# Altium PCB 后改2025底板线路板图.PcbDoc (part 4 of 4)
Units mm, origin at the board's own origin, x right, y up, seen from the top; angles counter-clockwise.
Board outline 200 x 230 mm, 4 copper layers (Top Layer, GND, POWER, Bottom Layer), stack 0.603 mm thick; 355 components, 331 nets, 1313 pads, 565 vias.
Unrouted connection lines stored in the file: 251.
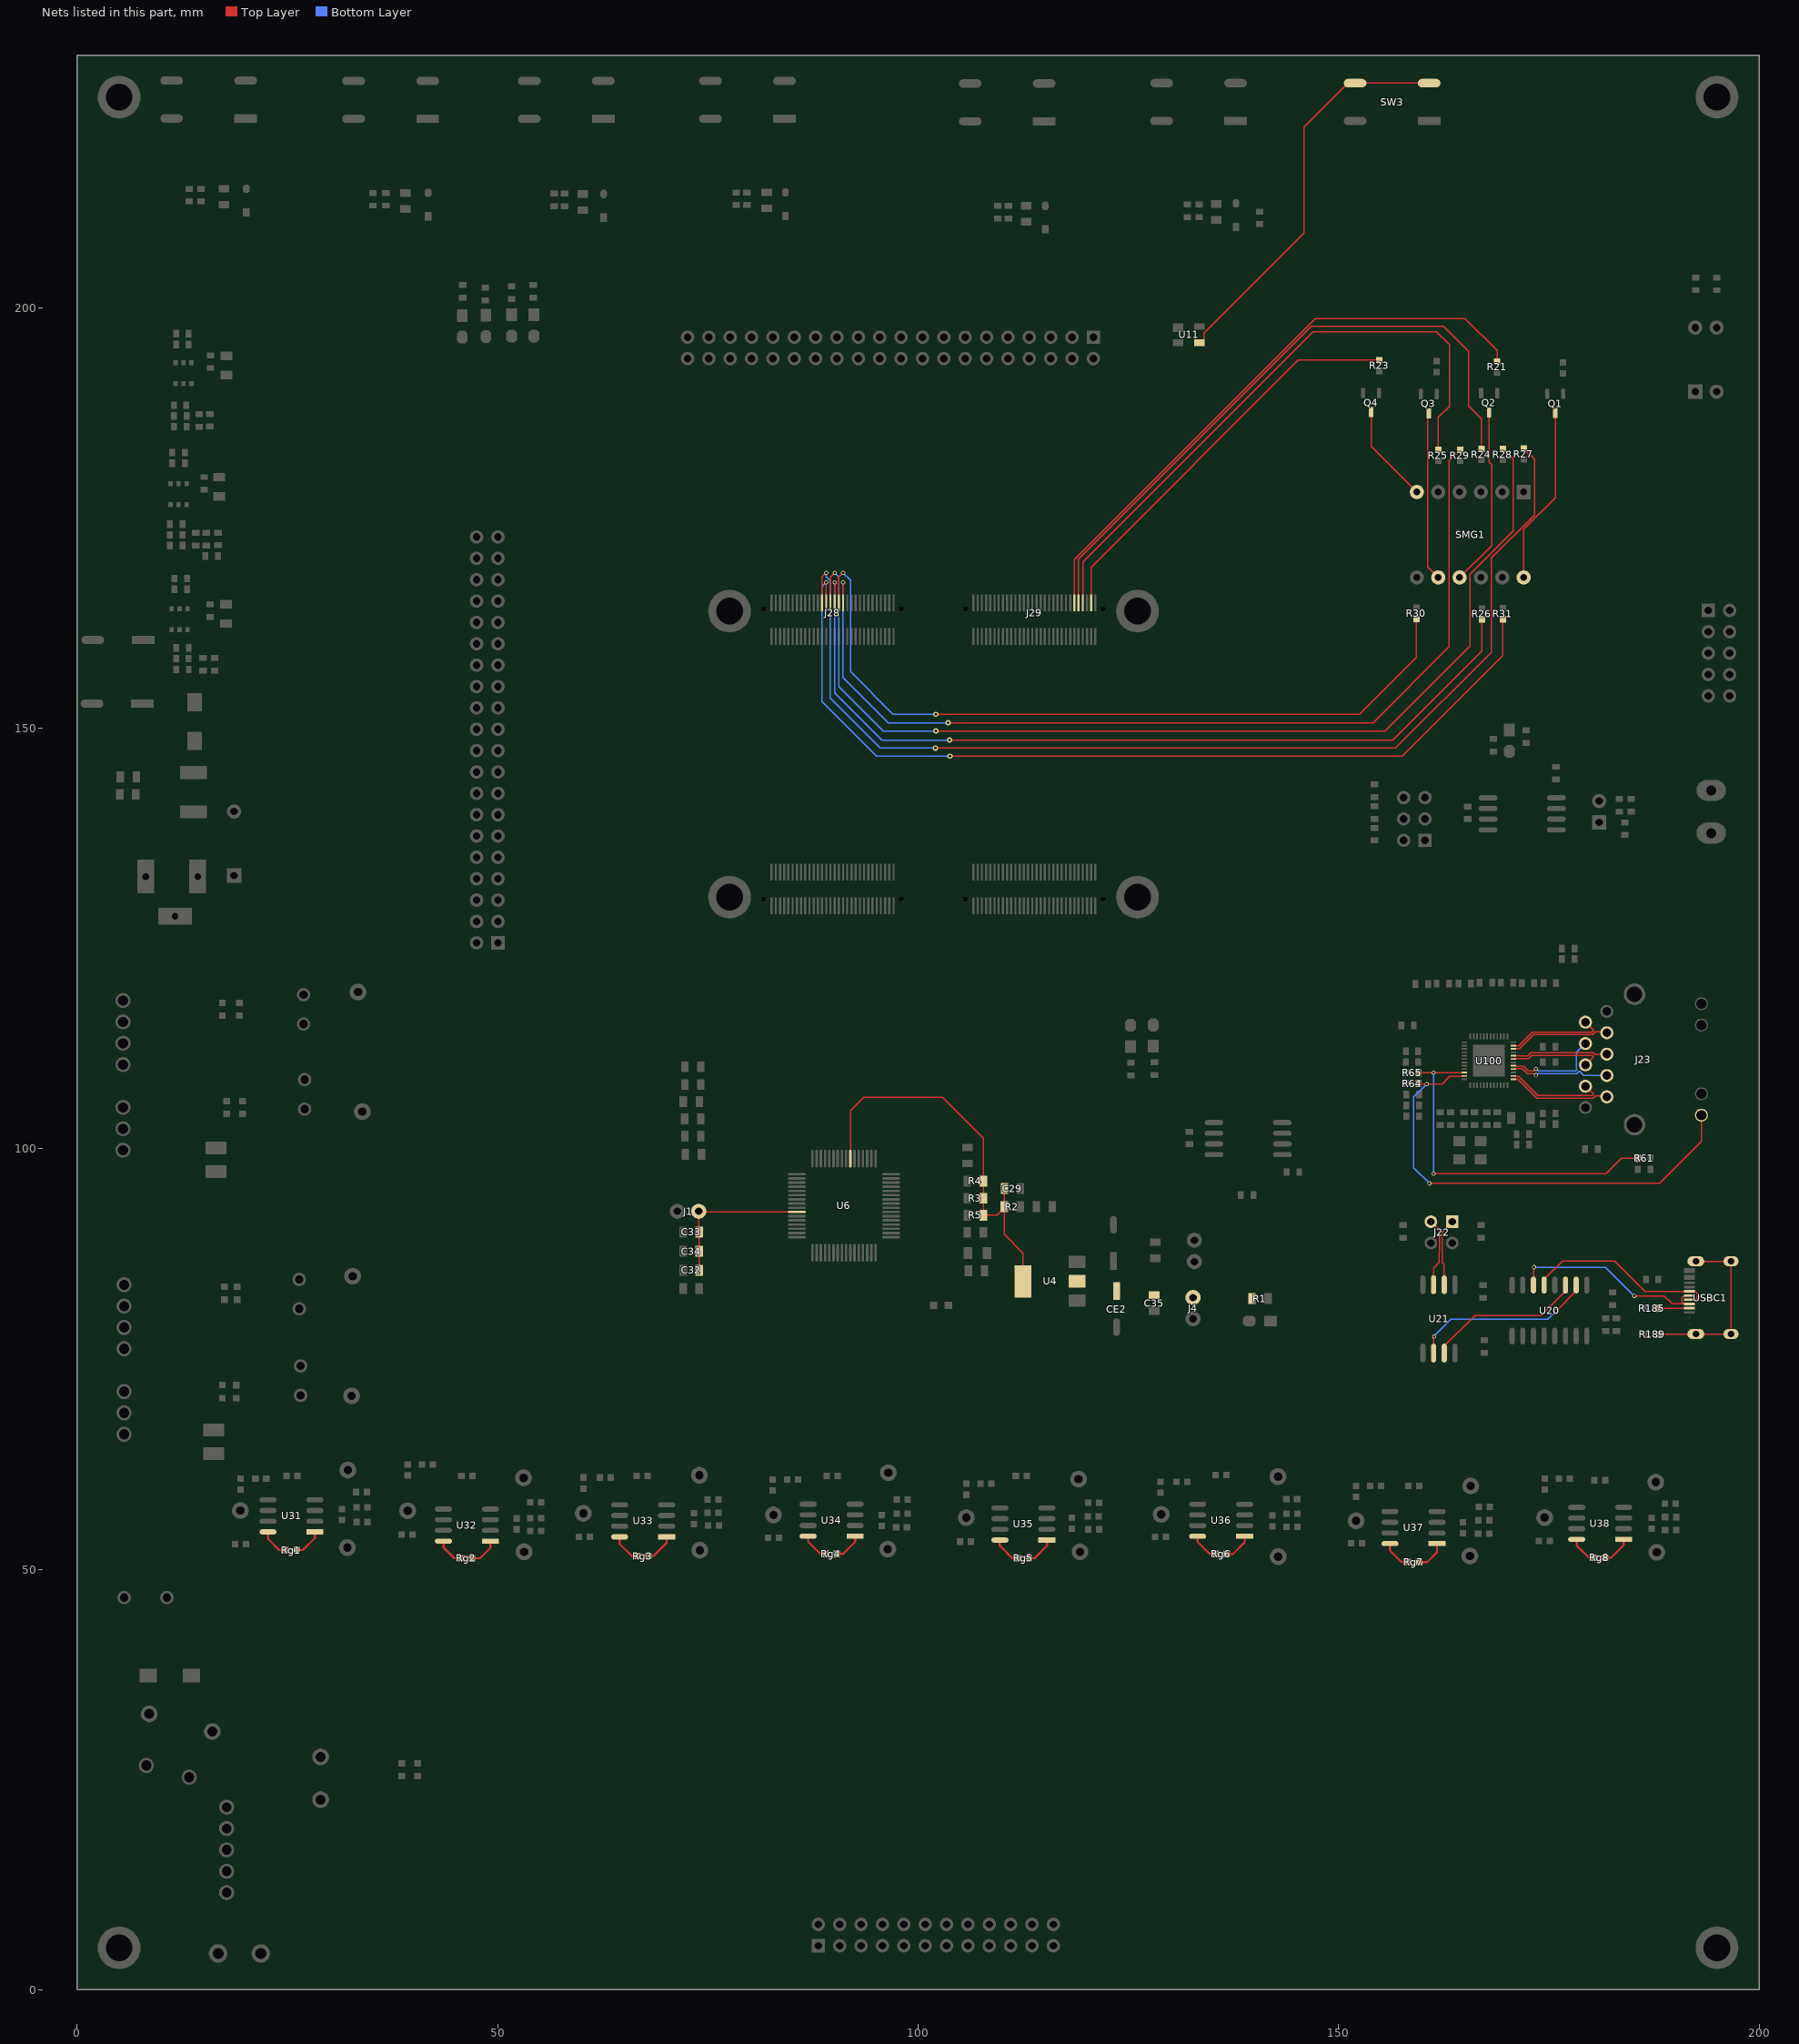
[diagram p6: the nets of this part, all layers, seen from the top]

## Via types
v1: diameter 0.508, hole 0.305, Top Layer to Bottom Layer, tented both sides, 558 vias
v2: diameter 0.635, hole 0.305, Top Layer to Bottom Layer, tented both sides, 7 vias

## Nets (pads, with @x,y where several pads share a name; then routed paths per layer and width w, separated by ;. In a path a pad name is that pad's centre, name@x,y a point inside that pad or via, vN(x,y) a via of type N, cw(c..) or ccw(c..) an arc to the next point about the centre after c; other vN are vias at no path point) (continued)
NetR185_1: R185.1 USBC1.A5 | length 3.6
  Top Layer w0.152: R185.1@188.087,81.026 188.095,81.034 USBC1.A5@191.707,81.034
NetR189_2: R189.2 USBC1.1 USBC1.2 USBC1.3 USBC1.4 | length 21.3
  Top Layer w0.152: R189.2@188.023,77.915 188.068,77.959 USBC1.4@192.475,77.959 ; USBC1.1@192.475,86.609 USBC1.2@196.537,86.609 ; USBC1.4@192.488,77.959 USBC1.3@196.655,77.959 ; USBC1.2@196.655,86.609 196.655,77.983 USBC1.3@196.659,77.978
NetRg1_1: Rg1.1 U31.1 | length 3.5
  Top Layer w0.254: Rg1.1@26.111,52.273 26.857,52.273 28.287,53.704 U31.1@28.287,54.434
NetRg1_2: Rg1.2 U31.8 | length 3.5
  Top Layer w0.254: U31.8@22.699,54.434 22.699,53.602 24.028,52.273 Rg1.2@24.811,52.273
NetRg2_1: Rg2.1 U32.1 | length 3.5
  Top Layer w0.254: Rg2.1@46.939,51.308 47.904,51.308 49.149,52.553 U32.1@49.149,53.34
NetRg2_2: Rg2.2 U32.8 | length 3.4
  Top Layer w0.254: U32.8@43.561,53.34 43.561,52.603 44.856,51.308 Rg2.2@45.639,51.308
NetRg3_1: Rg3.1 U33.1 | length 3.5
  Top Layer w0.254: Rg3.1@67.92,51.562 67.923,51.566 68.533,51.566 70.104,53.137 U33.1@70.104,53.848
NetRg3_2: Rg3.2 U33.8 | length 3.5
  Top Layer w0.254: U33.8@64.516,53.848 64.516,53.016 65.97,51.562 Rg3.2@66.62,51.562
NetRg4_1: Rg4.1 U34.1 | length 3.5
  Top Layer w0.254: Rg4.1@90.322,51.816 91.084,51.816 92.51,53.242 U34.1@92.51,53.926
NetRg4_2: Rg4.2 U34.8 | length 3.3
  Top Layer w0.254: U34.8@86.922,53.926 86.922,53.286 88.392,51.816 Rg4.2@89.022,51.816
NetRg5_1: Rg5.1 U35.1 | length 3.4
  Top Layer w0.254: Rg5.1@113.172,51.308 113.843,51.308 115.316,52.781 U35.1@115.316,53.467
NetRg5_2: Rg5.2 U35.8 | length 3.4
  Top Layer w0.254: U35.8@109.728,53.467 109.728,52.781 111.201,51.308 Rg5.2@111.872,51.308
NetRg6_1: Rg6.1 U36.1 | length 3.4
  Top Layer w0.254: Rg6.1@136.692,51.816 137.444,51.816 138.826,53.198 U36.1@138.826,53.916
NetRg6_2: Rg6.2 U36.8 | length 3.4
  Top Layer w0.254: U36.8@133.238,53.916 133.238,53.249 134.671,51.816 Rg6.2@135.392,51.816
NetRg7_1: Rg7.1 U37.1 | length 3.6
  Top Layer w0.254: Rg7.1@159.563,50.851 160.528,50.851 161.695,52.018 U37.1@161.695,53.042
NetRg7_2: Rg7.2 U37.8 | length 3.5
  Top Layer w0.254: U37.8@156.107,53.042 156.107,52.224 157.48,50.851 Rg7.2@158.263,50.851
NetRg8_1: Rg8.1 U38.1 | length 3.5
  Top Layer w0.254: Rg8.1@181.701,51.359 182.372,51.359 183.896,52.883 U38.1@183.896,53.545
NetRg8_2: Rg8.2 U38.8 | length 3.4
  Top Layer w0.254: U38.8@178.308,53.545 178.308,52.832 179.781,51.359 Rg8.2@180.401,51.359
NetSW3_2: SW3.2 SW3.3 U11.3 | length 48
  Top Layer w0.152: U11.3@133.452,195.809 133.706,195.809 134.01,196.113 134.01,196.933 145.898,208.82 145.898,221.459 151.112,226.674 SW3.3@151.962,226.674 SW3.2@160.762,226.674
NetU20_5: U20.5 USBC1.A6 USBC1.B6 | length 22.9
  Top Layer w0.152: U20.5@174.498,83.82 174.498,84.519 176.644,86.665 182.829,86.665 186.46,83.034 USBC1.B6@191.707,83.034 191.767,82.973 192.464,82.973 192.649,82.789 192.649,82.26 192.474,82.085 191.758,82.085 USBC1.A6@191.707,82.034
NetU20_6: U20.6 USBC1.A7 USBC1.B7 | length 24.9
  Top Layer w0.152: U20.6@173.165,83.782 173.196,83.814 173.196,85.871 v1(173.228,85.903) ; v1(185.166,82.486) 188.722,82.486 189.674,81.534 USBC1.B7@191.707,81.534 191.633,81.608 191.01,81.608 190.817,81.8 190.817,82.268 191.009,82.46 191.633,82.46 USBC1.A7@191.707,82.534
  Bottom Layer w0.152: v1(173.228,85.903) 181.75,85.903 v1(185.166,82.486)
OPT1: Q1.3 SMG1.12 | length 21.1
  Top Layer w0.152: SMG1.12@172.009,167.894 172.009,173.634 175.76,177.386 Q1.3@175.76,187.442
OPT2: Q2.3 SMG1.9 | length 21.3
  Top Layer w0.152: SMG1.9@164.389,167.894 168.199,171.704 168.199,181.305 167.894,181.61 Q2.3@167.894,187.518
OPT3: Q3.3 SMG1.8 | length 20.1
  Top Layer w0.152: Q3.3@160.723,187.411 160.579,187.266 160.579,169.164 SMG1.8@161.849,167.894
OPT4: Q4.3 SMG1.6 | length 11.7
  Top Layer w0.152: Q4.3@153.865,187.543 153.865,183.498 SMG1.6@159.309,178.054
P18: J29.11 R21.1 | length 70.1
  Top Layer w0.152: J29.11@118.578,164.889 118.578,170.012 147.245,198.679 165.049,198.679 168.859,194.869 R21.1@168.859,193.588
P20: J29.3 R23.1 | length 48.7
  Top Layer w0.152: J29.3@120.569,164.897 120.569,169.113 145.197,193.741 R23.1@154.838,193.741
PS_ETH_LED0: R61.1 R65.1 U100.34 | length 42.5
  Top Layer w0.152: R65.1@159.483,109.023 159.489,109.017 v1(161.287,109.017) 164.612,109.017 164.622,109.027 164.934,109.027 U100.34@164.957,109.051 ; v1(161.29,97.028) 181.813,97.028 183.642,98.857 R61.1@185.588,98.857
  Bottom Layer w0.152: v1(161.287,109.017) 161.287,104.074 161.297,104.064 161.297,97.035 v1(161.29,97.028)
PS_ETH_LED1: J23.11 R64.1 U100.35 | length 56.7
  Top Layer w0.152: R64.1@159.483,107.753 159.556,107.68 v1(160.471,107.68) 162.312,107.68 163.213,108.58 164.654,108.58 164.725,108.651 U100.35@164.957,108.651 ; v1(160.791,95.86) 188.163,95.86 193.138,100.834 J23.11@193.138,103.974
  Bottom Layer w0.152: v1(160.471,107.68) 158.933,106.142 158.933,97.718 v1(160.791,95.86)
PS_N0: J23.3 U100.2 | length 11.9
  Top Layer w0.152: U100.2@170.772,108.651 170.796,108.627 171.076,108.627 171.1,108.604 171.394,108.604 173.702,106.296 180.166,106.296 180.255,106.386 180.255,106.512 J23.3@179.348,107.419
PS_N1: J23.7 U100.5 | length 11.6
  Top Layer w0.152: U100.5@170.772,109.851 170.796,109.827 171.076,109.827 171.1,109.804 171.99,109.804 172.546,109.248 173.189,109.248 173.392,109.451 v1(173.456,109.451)
  Bottom Layer w0.152: v1(173.456,109.451) 173.52,109.451 173.723,109.248 178.176,109.248 178.309,109.381 178.309,109.507 178.294,109.523 178.294,111.445 J23.7@179.348,112.499
PS_N2: J23.6 U100.8 | length 11.4
  Top Layer w0.152: U100.8@170.772,111.051 170.796,111.027 171.076,111.027 171.1,111.003 172.46,111.003 172.849,111.393 180.298,111.393 180.476,111.214 181.873,111.214 J23.6@181.888,111.229
PS_N3: J23.9 U100.11 | length 11.7
  Top Layer w0.152: U100.11@170.772,112.251 170.796,112.227 171.076,112.227 171.1,112.204 171.39,112.204 173.044,113.858 180.108,113.858 180.255,114.006 180.255,114.132 J23.9@179.348,115.039
PS_P0: J23.2 U100.1 | length 12.2
  Top Layer w0.152: U100.1@170.772,108.251 170.796,108.275 171.076,108.275 171.1,108.299 171.268,108.299 173.575,105.991 180.292,105.991 180.561,106.261 181.776,106.261 J23.2@181.888,106.149
PS_P1: J23.4 U100.4 | length 11.8
  Top Layer w0.152: U100.4@170.772,109.451 170.796,109.475 171.076,109.475 171.1,109.499 171.864,109.499 172.42,108.943 173.189,108.943 173.392,108.74 v1(173.456,108.74)
  Bottom Layer w0.152: v1(173.456,108.74) 173.52,108.74 173.723,108.943 178.302,108.943 178.524,109.166 178.651,109.166 179.127,108.689 J23.4@181.888,108.689
PS_P2: J23.5 U100.7 | length 11.1
  Top Layer w0.152: U100.7@170.772,110.651 170.796,110.675 171.076,110.675 171.1,110.699 172.587,110.699 172.976,111.088 180.172,111.088 180.261,110.999 180.261,110.872 J23.5@179.348,109.959
PS_P3: J23.8 U100.10 | length 12
  Top Layer w0.152: U100.10@170.772,111.851 170.796,111.875 171.076,111.875 171.1,111.899 171.516,111.899 173.17,113.553 180.234,113.553 180.561,113.881 181.776,113.881 J23.8@181.888,113.769
R18: J29.7 R25.2 | length 73.5
  Top Layer w0.152: J29.7@119.578,164.889 119.578,169.721 146.961,197.104 161.646,197.104 163.17,195.58 163.17,188.265 161.849,186.944 R25.2@161.849,183.062
REFIN: C32.2 C33.2 C34.2 J1.1 U6.42 | length 18.8
  Top Layer w0.152: C32.2@73.975,85.534 C34.2@73.975,87.795 C33.2@73.975,90.081 73.914,90.142 J1.1@73.914,92.558 74.004,92.468 U6.42@85.586,92.468
RXD: U20.3 U21.7 | length 17.9
  Top Layer w0.152: U21.7@162.56,75.692 162.56,76.505 166.192,80.137 174.041,80.137 176.898,82.995 U20.3@176.975,82.995
RXD_1: J22.1 U21.2 | length 8.1
  Top Layer w0.152: 162.307,88.919 162.307,90.107 J22.1@163.512,91.313 ; 162.307,88.919 162.307,87.69 162.307,86.461 162.56,86.208 U21.2@162.56,83.82
SEG_A: J28.33 R31.2 | length 109.7
  Top Layer w0.152: J28.33@89.078,164.889 v1@89.078,167.31 ; v2(103.784,146.66) 157.555,146.66 169.52,158.624 R31.2@169.52,162.936
  Bottom Layer w0.152: v1(89.074,167.314) 88.578,166.818 88.578,153.164 95.083,146.66 v2(103.784,146.66)
SEG_B: J28.27 R30.2 | length 92.7
  Top Layer w0.152: J28.27@90.582,164.885 90.582,167.966 v1(91.074,168.457) ; v2(102.108,151.638) 152.502,151.638 159.258,158.394 R30.2@159.258,162.987
  Bottom Layer w0.152: v1(91.074,168.457) 91.96,167.571 91.96,161.747 91.96,156.698 97.021,151.638 v2(102.108,151.638)
SEG_C: J28.25 R29.2 | length 115.7
  Top Layer w0.152: J28.25@91.078,164.889 v1@91.078,167.31 ; v2(103.581,150.622) 154.076,150.622 163.119,159.664 163.119,181.742 R29.2@164.44,183.062
  Bottom Layer w0.152: v1(91.074,167.314) 91.074,156.034 96.485,150.622 v2(103.581,150.622)
SEG_D: J28.31 R28.2 | length 124.9
  Top Layer w0.152: J28.31@89.582,164.885 89.582,167.966 v1(90.074,168.457) ; v2(102.108,149.657) 155.499,149.657 165.613,159.771 165.613,168.287 170.739,173.414 170.739,181.945 169.824,182.859 R28.2@169.52,183.164
  Bottom Layer w0.152: v1(90.074,168.457) 90.591,167.94 90.591,154.93 95.865,149.657 v2(102.108,149.657)
SEG_DP: J29.9 R24.2 | length 76.5
  Top Layer w0.152: J29.9@119.069,164.897 119.069,170.073 146.761,197.764 162.458,197.764 165.456,194.767 165.456,188.28 166.98,186.756 R24.2@166.98,183.164
SEG_E: J28.35 R27.2 | length 131.5
  Top Layer w0.152: J28.35@88.582,164.885 88.582,167.966 v1(89.074,168.457) ; v2(102.057,147.625) 156.769,147.625 168.155,159.011 168.155,170.212 173.279,175.335 173.279,181.966 R27.2@172.009,183.236
  Bottom Layer w0.152: v1(89.074,168.457) 89.074,167.997 89.274,167.797 89.556,167.514 89.556,153.572 95.504,147.625 v2(102.057,147.625)
SEG_F: J28.29 R26.2 | length 103.1
  Top Layer w0.152: J28.29@90.078,164.889 v1@90.078,167.31 ; v2(103.734,148.59) 103.784,148.539 156.413,148.539 167.03,159.156 R26.2@167.03,162.926
  Bottom Layer w0.152: v1(90.074,167.314) 90.074,154.168 95.703,148.539 103.683,148.539 v2(103.734,148.59)
TXD: U20.2 U21.6 | length 21.9
  Top Layer w0.152: U21.6@161.29,75.692 161.315,75.717 161.315,77.648 v1(161.341,77.673) ; v1(175.895,80.709) 175.895,80.715 178.244,83.064 U20.2@178.244,83.782
  Bottom Layer w0.152: v1(161.341,77.673) 161.341,77.705 163.328,79.692 174.879,79.692 v1(175.895,80.709)
TXD_1: J22.3 U21.3 | length 8.2
  Top Layer w0.152: J22.3@160.972,91.313 161.931,90.354 161.967,90.318 162.002,88.796 cw(c160.972,88.773) 162.002,88.746 161.948,86.452 ; U21.3@161.29,83.82 161.29,85.73 161.29,85.793 161.948,86.452
VDRIVE: C29.2 C35.2 CE2.1 J4.1 R1.1 R2.2 R3.2 R4.2 R5.2 U4.2 U6.23 | length 48.2
  Top Layer w0.152: U6.23@91.936,98.818 91.953,98.835 91.953,104.53 93.533,106.11 102.893,106.11 107.757,101.246 R4.2@107.757,96.139 R3.2@107.757,94.107 R5.2@107.757,92.075 109.405,92.075 R2.2@110.239,92.909 ; C29.2@110.268,95.258 110.239,95.228 R2.2@110.239,93.099 R2.2@110.239,92.909 ; U4.2@112.47,84.218 112.47,87.58 110.239,89.812 R2.2@110.239,92.909
pads on no net: 1.1 2.1 3.1 7.1 8.1 9.1 10.1 ?.1 J16.6 J16.7 J16.8 J24.7 J24.8 J26. J26.1@97.128,127.239 J27. J27.1@121.128,127.239 J28. J28.1@97.128,166.489 J29. J29.1@121.128,166.489 SW241.1 SW241.4 SW241.5 U20.7 U20.8 U20.9 U20.10 U20.11 U20.12 U20.13 U20.14 U20.15 U31.5 U32.5 U33.5 U34.5 U35.5 U36.5 U37.5 U38.5 U100.12 U100.33 U100.46 U241.3 U241.5 U242.3 U242.5 USBC1.A8 USBC1.B8

## Polygon pours and split planes (outlines as drawn)
+5 on Top Layer "+5_L01_P312" (solid, pour order 312): 130.872,100.07 136.246,100.07 136.296,100.121 136.296,101.117 130.872,101.117
3V3 on Top Layer "3V3_L01_P310" (solid, pour order 310): 141.783,96.342 141.783,99.914 144.565,99.914 144.565,96.354 144.577,96.342
NetP241_2 on Top Layer "NETP241_2_L01_P000" (solid, pour order 0): 15.869,18.034 23.622,18.034 23.622,2.286 20.447,2.286 20.193,2.54 20.193,15.367 16.002,15.367
NetF241_1 on Top Layer "NETF241_1_L01_P001" (solid, pour order 1): 6.858,28.575 9.652,28.575 9.652,15.113 19.558,15.113 19.558,12.7 6.858,12.7
24V on Top Layer "24V_L01_P014" (solid, pour order 14): 17.526,23.876 17.526,33.02 14.605,33.02 14.605,26.797 11.684,26.797 11.684,23.876
24V on Top Layer "24V_L01_P016" (solid, pour order 16): 7.747,48.006 7.747,45.466 12.446,45.466 12.446,35.56 14.732,35.56 14.732,48.006
24V on Top Layer "24V_L01_P017" (solid, pour order 17): 30.734,29.21 30.734,26.162 17.018,26.162 17.018,29.21
24V on Top Layer "24V_L01_P020" (solid, pour order 20): 12.446,37.592 17.526,37.592 17.526,29.21 14.605,29.21 14.605,35.433 12.446,35.433
24V on Top Layer "24V_L01_P026" (solid, pour order 26): 10.22,45.593 7.061,45.593 7.061,51.816 0.254,51.816 0.254,98.298 1.905,98.298 1.905,53.594 10.085,53.594
24V on Top Layer "24V_L01_P027" (solid, pour order 27): 15.367,98.171 17.907,98.171 17.907,96.393 1.778,96.393 1.778,98.171
24V on Top Layer "24V_L01_P028" (solid, pour order 28): 15.247,64.643 17.787,64.643 17.787,62.865 1.778,62.865 1.778,64.643
24V on Top Layer "24V_L01_P029" (solid, pour order 29): 41.148,29.21 30.734,29.21 30.734,26.162 41.148,26.162
NetJACK1_1 on Top Layer "NETJACK1_1_L01_P031" (solid, pour order 31): 12.827,134.747 20.066,134.747 20.066,129.921 12.827,129.921
NetF1_1 on Top Layer "NETF1_1_L01_P032" (solid, pour order 32): 20.32,141.351 11.938,141.351 11.938,138.684 20.32,138.684
+12V on Top Layer "+12V_L01_P033" (solid, pour order 33): 12.192,143.891 15.494,143.891 15.494,149.479 15.367,149.606 12.192,149.606
+12V on Top Layer "+12V_L01_P035" (solid, pour order 35): 6.223,196.596 6.223,141.351 7.747,141.351 7.747,196.596
+12V on Top Layer "+12V_L01_P036" (solid, pour order 36): 7.709,144.628 12.408,144.628 12.408,147.32 7.709,147.32
+12V on Top Layer "+12V_L01_P037" (solid, pour order 37): 11.684,183.261 11.684,180.975 10.795,180.975 10.795,183.261
+12V on Top Layer "+12V_L01_P039" (solid, pour order 39): 11.811,176.276 11.811,177.673 10.795,177.673 10.795,178.816 11.43,178.816 11.43,178.308 12.319,178.308 12.319,176.276
+12V on Top Layer "+12V_L01_P040" (solid, pour order 40): 11.938,168.275 11.938,165.989 10.922,165.989 10.922,168.275
+12V on Top Layer "+12V_L01_P041" (solid, pour order 41): 10.909,163.728 11.544,163.728 11.544,166.268 10.909,166.268
+12V on Top Layer "+12V_L01_P042" (solid, pour order 42): 11.938,161.29 11.938,162.687 10.922,162.687 10.922,163.83 11.557,163.83 11.557,163.322 12.446,163.322 12.446,161.29
+12V on Top Layer "+12V_L01_P043" (solid, pour order 43): 12.192,197.358 12.192,195.135 11.303,195.135 11.303,197.358
+12V on Top Layer "+12V_L01_P044" (solid, pour order 44): 11.303,193.167 11.938,193.167 11.938,197.231 11.303,197.231
+12V on Top Layer "+12V_L01_P045" (solid, pour order 45): 12.319,190.627 12.319,192.024 11.303,192.024 11.303,193.167 11.938,193.167 11.938,192.659 12.827,192.659 12.827,190.627
+15V on Top Layer "+15V_L01_P066" (solid, pour order 66): 3.937,80.137 3.937,77.343 11.176,77.343 11.176,71.374 20.066,71.374 20.066,72.39 12.573,72.39 12.573,80.137
-15V on Top Layer "-15V_L01_P082" (solid, pour order 82): 3.81,85.217 3.81,82.423 7.493,82.423 7.493,83.185 20.701,83.185 20.701,84.328 7.493,84.328 7.493,85.217
-12V on Top Layer "-12V_L01_P096" (solid, pour order 96): 3.683,118.999 3.683,116.205 7.366,116.205 7.366,116.967 20.574,116.967 20.574,118.11 7.366,118.11 7.366,118.999
-12V on Top Layer "-12V_L01_P097" (solid, pour order 97): 20.328,120.65 35.179,120.65 35.179,116.967 20.328,116.967
+12V on Top Layer "+12V_L01_P099" (solid, pour order 99): 3.81,113.919 3.81,111.125 11.049,111.125 11.049,105.156 21.336,105.156 21.336,106.172 12.446,106.172 12.446,113.919
+12V on Top Layer "+12V_L01_P100" (solid, pour order 100): 21.209,106.172 36.06,106.172 36.06,102.489 21.209,102.489
-15V on Top Layer "-15V_L01_P101" (solid, pour order 101): 20.582,86.868 35.433,86.868 35.433,83.185 20.582,83.185
+15V on Top Layer "+15V_L01_P102" (solid, pour order 102): 20.066,72.39 34.917,72.39 34.917,68.707 20.066,68.707
+5 on Top Layer "+5_L01_P103" (solid, pour order 103): 12.573,186.563 12.573,188.849 17.018,188.849 17.018,192.595 19.406,192.595 19.406,186.563
3V3 on Top Layer "3V3_L01_P104" (solid, pour order 104): 11.811,172.529 11.811,174.815 16.129,174.815 16.129,178.181 18.44,178.181 18.44,172.529
1V8 on Top Layer "1V8_L01_P105" (solid, pour order 105): 12.7,157.734 12.7,160.02 17.018,160.02 17.018,163.195 19.456,163.195 19.456,157.734
+12V on Top Layer "+12V_L01_P107" (solid, pour order 107): 6.604,166.243 11.938,166.243 11.938,167.767 6.604,167.767
+12V on Top Layer "+12V_L01_P108" (solid, pour order 108): 6.985,181.102 11.557,181.102 11.557,182.626 6.985,182.626
+12V on Top Layer "+12V_L01_P109" (solid, pour order 109): 6.223,195.199 12.192,195.199 12.192,196.723 6.223,196.723
VDRIVE on Top Layer "VDRIVE_L01_P110" (solid, pour order 110): 140.335,85.026 140.335,80.899 130.175,80.899 129.35,81.724 123.19,81.724 121.73,83.185 111.379,83.185 111.379,85.026
+5 on Top Layer "+5_L01_P113" (solid, pour order 113): 117.792,87.884 134.772,87.884 134.772,85.242 117.792,85.242
3V3 on Top Layer "3V3_L01_P116" (solid, pour order 116): 191.88,204.47 191.88,202.946 195.5,202.946 195.478,202.968 195.478,204.47
AVCC on Top Layer "AVCC_L01_P135" (solid, pour order 135): 73.406,108.305 73.406,100.812 76.48,100.812 76.505,100.787 76.505,108.305 73.343,108.305
GND on Top Layer "GND_L01_P136" (solid, pour order 136): 153.67,103.784 159.106,103.784 159.106,101.413 153.757,101.413 153.757,103.647 153.67,103.734
GND on Top Layer "GND_L01_P137" (solid, pour order 137): 171.806,99.035 171.806,97.917 181,97.917 181,98.984 180.899,99.085 180.848,99.035
3V3 on Top Layer "3V3_L01_P138" (solid, pour order 138): 173.359,100.736 173.359,99.619 179.527,99.619 179.527,100.787 179.476,100.736
NetC17_1 on Top Layer "NETC17_1_L01_P179" (solid, pour order 179): 12.421,178.664 12.421,179.832 17.678,179.832 17.678,180.645 11.684,180.645 11.684,178.664
NetC5_1 on Top Layer "NETC5_1_L01_P180" (solid, pour order 180): 12.929,193.078 12.929,194.035 18.847,194.035 18.847,194.97 12.192,194.97 12.192,193.078
NetC6_1 on Top Layer "NETC6_1_L01_P181" (solid, pour order 181): 12.548,163.765 12.548,164.719 18.618,164.719 18.618,165.746 11.811,165.746 11.811,163.765
NetC6_1 on Top Layer "NETC6_1_L01_P182" (solid, pour order 182): 15.235,164.832 15.235,163.844 18.694,163.844 18.694,164.832
NetC17_1 on Top Layer "NETC17_1_L01_P183" (solid, pour order 183): 14.524,180.022 14.524,179.033 17.678,179.033 17.678,180.022
NetC5_1 on Top Layer "NETC5_1_L01_P184" (solid, pour order 184): 15.387,194.398 15.387,193.409 18.847,193.409 18.847,194.398
+12V on Top Layer "+12V_L01_P186" (solid, pour order 186): 7.747,141.351 7.865,135.636 2.644,135.636 2.541,113.923 3.957,113.872 4.064,111.15 0.61,111.1 1.219,137.871 6.274,137.802 6.207,142.723 7.877,142.782
+12V on Top Layer "+12V_L01_P252" (solid, pour order 252): 7.061,154.94 9.398,154.94 9.398,151.486 7.112,151.486 7.112,154.838 7.061,154.889
+12V on Top Layer "+12V_L01_P253" (solid, pour order 253): 6.96,162.814 9.296,162.814 9.296,159.36 7.01,159.36 7.01,162.712 6.96,162.763
AGND on Top Layer "AGND_L01_P255" (solid, pour order 255): 0,125.976 103.188,125.976 103.188,125.366 103.188,72.28 200.122,72.28 200,0 -0.235,0
+12V on Top Layer "+12V_L01_P269" (solid, pour order 269): 10.795,178.816 11.43,178.816 11.43,183.103 10.795,183.103
NetL5_1 on Top Layer "NETL5_1_L01_P282" (solid, pour order 282): 169.965,107.876 169.965,102.559 171.01,102.559 171.01,107.876
DVDD10_PS on Top Layer "DVDD10_PS_L01_P283" (solid, pour order 283): 172.023,104.728 172.036,104.741 173.81,104.741 173.81,103.459 175.01,103.459 175.01,99.924 171.914,99.924 171.914,104.728 171.926,104.741
ADVDD10_PS on Top Layer "ADVDD10_PS_L01_P284" (solid, pour order 284): 175.21,104.741 175.21,102.359 176.21,102.359 176.21,104.741 175.01,104.741
3V3 on Top Layer "3V3_L01_P285" (solid, pour order 285): 168.315,107.876 168.315,104.778 167.086,104.778 167.086,103.581 169.418,103.581 169.418,105.802 168.965,105.802 168.965,107.876
GND on Top Layer "GND_L01_P291" (solid, pour order 291): 161.519,103.308 163.871,103.308 163.871,102.378 161.519,102.378
GND on Top Layer "GND_L01_P292" (solid, pour order 292): 164.363,103.308 166.715,103.308 166.715,102.378 164.363,102.378
GND on Top Layer "GND_L01_P293" (solid, pour order 293): 167.086,103.308 169.438,103.308 169.438,102.378 167.086,102.378
GND on Top Layer "GND_L01_P294" (solid, pour order 294): 170.584,99.949 170.584,102.301 171.514,102.301 171.514,99.949
GND on Top Layer "GND_L01_P295" (solid, pour order 295): 158.733,108.303 158.813,108.223 158.813,103.308 157.613,103.308 157.613,108.223 157.533,108.303
GND on Top Layer "GND_L01_P305" (solid, pour order 305): 0,230 200,230 200,0.566 0,0.566
GND on POWER "GND_L03_P316" (solid, pour order 316): 0,230 200,230 200,0 0,0
3V3 on POWER "3V3_L03_P315" (solid, pour order 315): 144.09,96.656 142.206,96.656 142.138,96.723 142.138,99.619 153.924,99.619 153.873,99.568 153.873,98.146 144.101,98.146 144.09,98.134
+5 on POWER "+5_L03_P314" (solid, pour order 314): 135.687,101.117 135.687,100.07 132.292,100.07 131.064,100.07 131.064,87.364 129.208,87.364 129.208,101.094 135.636,101.094
+15V on POWER "+15V_L03_P144" (solid, pour order 144): 18.866,51.918 21.285,51.918 21.285,49.632 39.152,49.632 39.152,53.34 40.557,53.34 40.557,49.632 60.386,49.632 60.386,53.016 61.61,53.016 61.61,49.632 82.865,49.632 82.865,52.781 84.089,52.781 84.089,49.691 105.727,49.691 105.727,52.426 106.949,52.426 106.949,49.691 128.934,49.691 128.934,53.188 130.155,53.188 130.155,49.691 152.273,49.635 152.273,52.172 153.446,52.172 153.446,49.632 174.483,49.632 174.483,52.426 176.073,52.426 176.073,46.634 18.829,46.634
+15V on POWER "+15V_L03_P145" (solid, pour order 145): 27.788,72.593 35.408,72.593 35.408,68.529 35.154,68.529 34.95,68.529 24.232,68.529 22.86,67.158 21.234,65.532 21.234,61.417 21.285,61.366 16.002,61.366 16.002,54.153 16.002,49.733 18.936,49.733 18.936,46.634 13.208,46.634 13.208,65.176 16.662,65.176 24.079,72.593
-15V on POWER "-15V_L03_P146" (solid, pour order 146): 182.817,61.316 180.657,61.316 180.657,63.297 160.426,63.297 160.426,60.757 158.726,60.757 158.726,63.297 137.719,63.297 137.719,62.128 135.352,62.128 135.352,63.297 114.097,63.297 114.097,61.925 111.603,61.925 111.603,63.297 91.542,63.297 91.542,61.925 89.393,61.925 89.393,63.297 68.783,63.297 68.783,61.925 66.802,61.925 66.802,63.602 47.64,63.602 47.64,61.925 45.959,61.925 45.959,63.652 27.146,63.652 27.044,63.551 27.044,62.128 24.994,62.128 24.994,64.872 182.842,64.872
-15V on POWER "-15V_L03_P147" (solid, pour order 147): 23.978,87.478 24.079,87.376 24.079,83.007 36.974,83.007 37.338,82.194 37.338,64.668 42.977,64.668 42.824,64.821 42.824,87.681 24.232,87.681 24.079,87.528
-15V on POWER "-15V_L03_P148" (solid, pour order 148): 24.994,66.954 184.607,66.954 184.607,63.246 24.994,63.246
+12V on POWER "+12V_L03_P150" (solid, pour order 150): 105.618,114.726 38.918,114.726 38.918,123.667 6.762,123.667 6.762,143.594 16.769,143.594 16.769,147.238 4.679,147.238 4.679,121.28 36.022,121.28 36.022,110.866 108.26,110.866 108.26,114.726
3V3 on POWER "3V3_L03_P151" (solid, pour order 151): 18.542,172.72 18.491,172.669 5.944,172.669 5.944,209.804 6.35,210.21 14.182,210.21 14.182,211.785 15.282,211.785 15.282,209.194 35.72,209.194 35.72,211.379 37.287,211.379 37.287,213.563 77.864,213.563 111.658,213.563 111.658,207.518 111.506,207.366 110.084,207.366 110.084,210.82 109.626,211.277 58.979,211.277 58.928,211.328 58.928,209.194 57.255,209.194 57.255,211.576 39.415,211.576 37.287,209.448 37.287,207.366 10.16,207.366 10.16,176.378 18.542,176.378
3V3 on POWER "3V3_L03_P153" (solid, pour order 153): 132.777,208.548 132.842,208.483 134.112,208.483 134.112,212.192 149.149,212.192 149.149,215.144 110.084,215.144 110.084,211.226 132.639,211.226 132.69,211.176 132.69,208.548
3V3 on POWER "3V3_L03_P154" (solid, pour order 154): 147.676,215.138 196.444,215.138 196.444,201.93 191.313,201.93 191.567,202.184 191.567,212.09 147.523,212.09 147.523,215.595
3V3 on POWER "3V3_L03_P155" (solid, pour order 155): 156.82,92.812 166.268,92.812 166.268,84.023 168.402,84.023 168.402,94.082 156.82,94.082
3V3 on POWER "3V3_L03_P157" (solid, pour order 157): 156.007,110.846 156.111,110.843 157.521,110.843 157.521,108.315 157.53,108.306 155.905,108.306 155.905,110.846
3V3 on POWER "3V3_L03_P161" (solid, pour order 161): 156.972,92.964 156.972,91.796 158.598,91.796 158.598,93.116 157.124,93.116 156.82,92.812
3V3 on POWER "3V3_L03_P162" (solid, pour order 162): 163.17,84.684 167.589,84.684 167.64,84.633 167.691,84.684 167.691,86.157 163.22,86.157 163.17,86.208
3V3 on POWER "3V3_L03_P164" (solid, pour order 164): 192.211,125.694 192.073,125.832 158.191,125.832 158.191,128.284 192.11,128.284 192.11,125.846 192.059,125.795
3V3 on POWER "3V3_L03_P165" (solid, pour order 165): 175.006,144.729 174.955,144.678 174.955,143.295 167.437,143.295 167.437,151.282 169.57,151.282 169.621,151.232 169.367,150.978 169.367,144.78 174.854,144.78 174.904,144.729
3V3 on POWER "3V3_L03_P166" (solid, pour order 166): 195.326,162.662 195.275,162.611 195.275,159.918 199.542,159.918 199.593,159.969 199.441,160.122 199.441,181.102 195.326,181.102 195.275,181.051 195.275,165.608 197.815,165.608 198.018,165.405 197.764,165.151 197.764,162.662
3V3 on POWER "3V3_L03_P167" (solid, pour order 167): 195.783,204.876 195.529,205.13 183.591,205.13 183.591,181.864 183.642,181.813 183.642,181.204 195.275,181.204 196.088,180.391 199.441,180.391 199.441,185.674 199.136,185.979 187.96,185.979 187.96,202.032 188.011,202.082 188.163,201.93 196.444,201.93 196.444,205.029 196.393,205.08 196.291,204.978 195.631,204.978
3V3 on POWER "3V3_L03_P168" (solid, pour order 168): 167.437,149.809 167.437,168.097 198.933,168.097 198.933,165.811 199.136,165.608 198.577,165.049 170.18,165.049 170.18,144.729 167.386,144.729 167.386,150.673 167.538,150.825
3V3 on POWER "3V3_L03_P169" (solid, pour order 169): 114.554,192.659 117.043,192.659 117.043,197.536 116.688,197.891 116.688,204.368 111.658,204.368 111.658,207.518 110.033,207.518 110.033,202.946 114.452,202.946 114.554,202.844
3V3 on POWER "3V3_L03_P171" (solid, pour order 171): 153.873,109.461 153.873,92.927 155.651,92.927 155.651,109.39 155.722,109.461
3V3 on POWER "3V3_L03_P172" (solid, pour order 172): 158.394,94.082 158.394,91.796 153.873,91.796 153.873,94.082 158.191,94.082
3V3 on POWER "3V3_L03_P173" (solid, pour order 173): 157.521,110.843 157.521,108.525 157.352,108.356 153.873,108.356 153.873,110.843
3V3 on POWER "3V3_L03_P174" (solid, pour order 174): 191.262,128.27 191.262,115.948 195.174,115.948 195.174,128.27
3V3 on POWER "3V3_L03_P175" (solid, pour order 175): 178.562,119.532 193.003,119.532 193.003,121.31 178.562,121.31
3V3 on POWER "3V3_L03_P177" (solid, pour order 177): 160.274,128.219 160.325,128.168 160.325,119.108 158.191,119.108 158.191,128.284 160.056,128.284 160.172,128.168
3V3 on POWER "3V3_L03_P178" (solid, pour order 178): 188.062,165.52 188.062,126.289 185.609,126.289 185.609,165.723
3V3 on POWER "3V3_L03_P185" (solid, pour order 185): 134.112,208.548 134.256,198.679 132.69,198.679 132.69,208.548
1V8 on POWER "1V8_L03_P187" (solid, pour order 187): 163.764,120.188 163.796,121.467 174.777,121.467 174.83,124.261 176.124,124.261 176.124,121.467 175.336,121.467 175.285,120.24
1V8 on POWER "1V8_L03_P188" (solid, pour order 188): 169.977,114.557 165.84,114.498 165.84,115.57 167.488,115.57 167.5,120.286 168.7,120.286 168.656,115.57 169.977,115.57
1V8 on POWER "1V8_L03_P189" (solid, pour order 189): 168.54,116.804 167.945,117.399 156.312,117.399 156.312,118.618 168.438,118.618 168.438,116.956 168.388,116.905
1V8 on POWER "1V8_L03_P190" (solid, pour order 190): 156.221,111.053 157.521,111.013 157.521,117.779 156.328,117.779
+5 on POWER "+5_L03_P191" (solid, pour order 191): 119.583,197.663 119.532,192.583 122.174,192.583 122.174,197.815 119.583,197.815 119.583,197.612
+5 on POWER "+5_L03_P192" (solid, pour order 192): 46.304,123.203 51.384,123.152 51.384,125.793 46.152,125.793 46.152,123.203 46.355,123.203
+5 on POWER "+5_L03_P193" (solid, pour order 193): 17.018,190.722 16.951,186.573 20.371,186.502 20.371,190.695
+5 on POWER "+5_L03_P194" (solid, pour order 194): 19.845,188.671 19.845,186.504 150.165,184.709 150.165,187.706
+5 on POWER "+5_L03_P195" (solid, pour order 195): 119.579,192.918 119.485,187.037 122.174,186.981 122.174,192.897
+5 on POWER "+5_L03_P196" (solid, pour order 196): 51.054,125.743 51.011,123.073 57.709,122.934 57.709,125.69
+5 on POWER "+5_L03_P197" (solid, pour order 197): 58.014,186.332 57.408,122.929 60.808,122.858 60.808,186.332
+5 on POWER "+5_L03_P198" (solid, pour order 198): 183.108,136.555 183.057,133.363 184.81,133.327 184.81,136.541
+5 on POWER "+5_L03_P199" (solid, pour order 199): 184.815,134.62 148.362,134.9 148.313,132.537 184.815,132.537
+5 on POWER "+5_L03_P200" (solid, pour order 200): 148.31,187.706 148.31,132.716 150.673,132.666 150.673,187.706
1V8 on POWER "1V8_L03_P202" (solid, pour order 202): 156.388,118.567 156.388,117.147 142.189,117.147 142.189,118.567
1V8 on POWER "1V8_L03_P203" (solid, pour order 203): 144.401,118.364 142.24,118.364 142.24,142.799 144.401,142.799
1V8 on POWER "1V8_L03_P204" (solid, pour order 204): 143.307,142.799 143.307,141.072 68.936,141.072 68.936,143.353
1V8 on POWER "1V8_L03_P205" (solid, pour order 205): 68.905,142.773 70.968,142.773 70.968,117.932 68.686,117.932
1V8 on POWER "1V8_L03_P206" (solid, pour order 206): 41.707,118.119 41.707,120.142 70.993,120.142 70.993,117.86
1V8 on POWER "1V8_L03_P207" (solid, pour order 207): 43.993,118.643 41.707,118.643 41.707,161.442 44.265,161.442
1V8 on POWER "1V8_L03_P208" (solid, pour order 208): 42.164,161.45 42.164,158.242 17.094,158.242 17.094,161.45
AVCC on POWER "AVCC_L03_P209" (solid, pour order 209): 78.794,105.918 78.794,88.9 80.572,88.9 80.572,105.918
AVCC on POWER "AVCC_L03_P210" (solid, pour order 210): 80.41,89.814 80.41,88.929 84.08,88.873 84.08,89.814
AVCC on POWER "AVCC_L03_P211" (solid, pour order 211): 80.461,95.047 80.461,94.285 84.131,94.229 84.131,95.047
AVCC on POWER "AVCC_L03_P212" (solid, pour order 212): 73.965,105.918 73.965,103.229 79.146,103.15 79.146,105.918
+5 on POWER "+5_L03_P213" (solid, pour order 213): 108.858,84.779 110.236,84.779 110.236,88.138 108.858,88.138
+5 on POWER "+5_L03_P214" (solid, pour order 214): 134.417,85.242 134.417,87.983 110.033,87.983 110.033,85.242
-15V on POWER "-15V_L03_P222" (solid, pour order 222): 109.88,6.553 109.88,0.864 112.319,0.864 112.319,6.553
-15V on POWER "-15V_L03_P223" (solid, pour order 223): 185.921,3.454 110.026,3.454 110.077,0.864 185.921,0.864
-15V on POWER "-15V_L03_P224" (solid, pour order 224): 192.837,66.421 192.837,10.516 197.714,10.516 197.714,66.421
+15V on POWER "+15V_L03_P225" (solid, pour order 225): 109.741,3.61 109.741,47.501 107.201,47.501 107.201,9.249 107.201,3.61
-15V on POWER "-15V_L03_P226" (solid, pour order 226): 189.89,3.404 184.76,3.404 184.76,0.762 184.861,0.864 189.89,0.864
-15V on POWER "-15V_L03_P227" (solid, pour order 227): 197.714,66.954 184.607,66.954 184.607,63.246 197.714,63.246
-15V on POWER "-15V_L03_P228" (solid, pour order 228): 186.792,13.868 186.792,3.2 189.89,3.2 189.84,3.251 189.84,13.868
-15V on POWER "-15V_L03_P229" (solid, pour order 229): 193.091,10.516 193.091,13.919 189.636,13.919 189.636,10.516
3V3 on POWER "3V3_L03_P247" (solid, pour order 247): 152.197,192.303 152.197,190.424 184.048,190.424 184.048,192.303
+12V on POWER "+12V_L03_P248" (solid, pour order 248): 121.463,135.026 121.463,126.746 119.329,126.746 119.329,135.026
+12V on POWER "+12V_L03_P249" (solid, pour order 249): 110.642,123.495 110.642,110.896 108.052,110.896 108.052,123.495
+12V on POWER "+12V_L03_P250" (solid, pour order 250): 110.439,123.495 121.514,123.495 121.514,121.158 110.439,121.158
+12V on POWER "+12V_L03_P251" (solid, pour order 251): 119.329,121.412 119.329,129.692 121.463,129.692 121.463,121.412
+5 on POWER "+5_L03_P271" (solid, pour order 271): 23.063,188.214 24.841,188.214 24.841,164.719 23.063,164.719
+5 on POWER "+5_L03_P272" (solid, pour order 272): 2.286,164.465 2.286,166.243 24.841,166.243 24.841,164.465
+5 on POWER "+5_L03_P273" (solid, pour order 273): 2.794,92.151 1.016,92.151 1.016,166.243 2.794,166.243
+5 on POWER "+5_L03_P274" (solid, pour order 274): 1.118,92.151 1.118,93.929 63.297,93.929 63.297,92.151
+5 on POWER "+5_L03_P275" (solid, pour order 275): 63.348,73.584 61.57,73.584 61.57,93.955 63.348,93.955
+5 on POWER "+5_L03_P276" (solid, pour order 276): 110.265,75.133 110.265,73.355 61.443,73.355 61.443,75.133
+5 on POWER "+5_L03_P277" (solid, pour order 277): 108.886,74.778 110.265,74.778 110.265,85.058 108.886,85.058
3V3 on POWER "3V3_L03_P278" (solid, pour order 278): 155.143,144.12 155.143,137.312 156.386,137.312 156.464,137.39 156.464,143.295 168.085,143.295 168.199,143.408 168.058,143.549 168.058,145.821 155.27,145.821 155.143,145.694 155.143,144.17
AGND on POWER "AGND_L03_P280" (solid, pour order 280): 0,122.535 0,0 200,0 199.848,0.152 199.848,68.829 102.987,68.829 102.901,68.915 102.901,122.459 0.076,122.459
ADVDD10_PS on POWER "ADVDD10_PS_L03_P286" (solid, pour order 286): 173.837,112.641 173.837,111.541 172.425,111.541 172.415,111.551 172.415,107.949 171.082,107.949 171.105,107.971 171.105,112.651 173.827,112.651
ADVDD10_PS on POWER "ADVDD10_PS_L03_P288" (solid, pour order 288): 176.237,107.949 176.21,107.922 176.21,102.359 175.21,102.359 175.21,106.819 171.162,106.819 171.1,106.881 171.105,106.886 171.105,107.971 172.392,107.971 172.415,107.949
3V3 on POWER "3V3_L03_P297" (solid, pour order 297): 167.831,106.943 167.831,105.876 161.287,105.876 161.287,103.383 160.001,103.383 160.001,106.943
3V3 on POWER "3V3_L03_P298" (solid, pour order 298): 172.976,110.855 172.976,109.83 177.838,109.83 177.838,119.474 177.779,119.532 178.562,119.532 178.562,121.31 176.554,121.31 176.554,110.87 176.53,110.846 176.521,110.855
3V3 on POWER "3V3_L03_P299" (solid, pour order 299): 167.058,106.974 167.058,104.021 167.058,103.778 169.415,103.778 169.418,103.781 169.418,104.692 168.315,104.692 168.315,106.974
3V3 on POWER "3V3_L03_P300" (solid, pour order 300): 161.287,103.383 161.287,100.854 161.22,100.787 155.448,100.787 155.448,102.108 160.02,102.108 160.001,102.127 160.001,103.383
3V3 on POWER "3V3_L03_P301" (solid, pour order 301): 168.199,94.082 168.199,91.897 198.222,91.897 198.222,94.082
3V3 on POWER "3V3_L03_P302" (solid, pour order 302): 195.174,92.304 198.462,92.304 198.425,92.341 198.425,118.821 195.174,118.821
ADVDD10_PS on POWER "ADVDD10_PS_L03_P306" (solid, pour order 306): 175.21,100.004 163.796,100.004 163.796,104.753 163.771,104.778 162.771,104.778 162.771,98.954 176.21,98.954 176.21,102.359 175.21,102.359
GND on Bottom Layer "GND_L04_P320" (solid, pour order 320): 0,230 0,122.427 102.869,122.427 102.879,122.437 102.879,68.741 199.811,68.741 200,68.93 200,230
AGND on Bottom Layer "AGND_L04_P319" (solid, pour order 319): 0,122.276 102.718,122.276 102.718,68.58 200,68.58 199.801,68.381 199.801,0 0,0
3V3 on Bottom Layer "3V3_L04_P309" (solid, pour order 309): 163.22,86.157 163.17,86.106 163.17,83.481 164.514,83.481 164.592,83.403 164.592,86.136 163.241,86.136 163.22,86.157
DVDD10_PS on Bottom Layer "DVDD10_PS_L04_P290" (solid, pour order 290): 164.017,107.851 168.767,107.851 168.767,105.609 173.575,105.609 173.575,99.924 171.914,99.924 171.914,104.728 171.926,104.741 171.889,104.778 167.749,104.778 167.749,107.059 162.969,107.059 162.969,111.951 164.017,111.951
GND on GND "GND_L02_P318" (solid, pour order 318): 0.038,122.443 0.205,122.276 102.718,122.276 102.718,69.098 102.913,68.902 199.972,68.902 199.972,229.972 200,230 0,230
AGND on GND "AGND_L02_P317" (solid, pour order 317): 0,122.427 0.152,122.276 102.718,122.276 102.718,68.58 103.04,68.902 199.972,68.902 199.972,0.379 199.593,0 0,0 0,122.383 0.076,122.459

## Other copper
Multi-Layer:
  pour cut-out: 120.84,62.412 120.84,50.156 117.585,50.156 117.585,54.169 111.387,54.169 111.387,55.439 111.336,55.388 108.492,55.388 108.492,56.404 117.585,56.404 117.585,62.412
  pour cut-out: 75.599,62.89 75.599,50.519 72.398,50.519 72.398,54.532 66.201,54.532 66.201,55.802 66.15,55.751 63.305,55.751 63.305,56.767 63.407,56.767 72.398,56.767 72.398,62.89
  pour cut-out: 144.475,62.687 144.475,50.598 141.102,50.598 141.102,54.611 134.904,54.611 134.904,55.881 134.853,55.83 132.009,55.83 132.009,56.846 141.102,56.846 141.102,62.687
  pour cut-out: 167.335,61.57 167.335,49.709 163.986,49.709 163.986,53.722 157.788,53.722 157.788,54.992 157.737,54.942 154.892,54.942 154.892,55.958 163.986,55.958 163.986,61.57
  pour cut-out: 54.644,62.524 54.644,50.011 51.443,50.011 51.443,54.024 45.246,54.024 45.246,55.294 45.195,55.243 42.35,55.243 42.35,56.259 42.452,56.259 51.443,56.259 51.443,62.524
  pour cut-out: 189.433,61.874 189.433,50.237 186.162,50.237 186.162,54.25 179.965,54.25 179.965,55.52 179.914,55.469 177.069,55.469 177.069,56.485 186.162,56.485 186.162,61.874
  pour cut-out: 98.247,63.094 98.247,50.593 94.801,50.593 94.801,54.606 88.603,54.606 88.603,55.876 88.552,55.826 85.707,55.826 85.707,56.842 94.801,56.842 94.801,63.094
  pour cut-out: 33.782,63.652 33.782,51.105 30.582,51.105 30.582,55.118 24.384,55.118 24.384,56.388 24.333,56.337 21.488,56.337 21.488,57.353 21.59,57.353 30.582,57.353 30.582,63.652

## Silkscreen, mask and mechanical layers (free items; w line width, h text height)
Top Overlay:
  drawing of 1040 lines, arcs and shapes, not listed
  text "MIO5" at 194.031,206.866 h0.76
  text "MIO4" at 190.271,206.815 h0.76
  text "1" at 98.516,166.186 h0.76 r180
  text "59" at 82.51,166.059 h0.76 r180
  text "SS15" at 78.696,164.206 h0.76 r180
  text "SS16" at 127.204,164.206 h0.76 r180
  text "60" at 82.51,160.344 h0.76 r180
  text "2" at 98.601,160.217 h0.76 r180
  text "485B" at 198.399,146.533 h0.76 r90
  text "60" at 82.51,134.182 h0.76 r180
  text "60" at 106.513,134.182 h0.76 r180
  text "485A" at 198.806,130.48 h0.76 r90
  text "SS18" at 78.907,130.27 h0.76 r180
  text "SS17" at 127.204,130.207 h0.76 r180
  text "59" at 106.513,128.34 h0.76 r180
  text "DC   12V" at 4.343,124.265 h0.76
  text "1" at 172.6,107.702 h0.76
  text "1" at 99.457,88.895 h0.76
  text "1" at 179.49,85.584 h0.76
  text "OUT" at 172.847,60.02 h0.76
  text "+" at 194.234,59.588 h0.76
  text "-" at 194.234,50.902 h0.76
  text "-" at 78.064,6.316 h4
  text "+" at 25.943,3.178 h4
  text "-" at 9.738,2.912 h4
  text "+" at 77.911,2.874 h4
Mechanical 1:
  the board outline again, w0.254

## Text inside footprints (layer, text, board x,y; h text height)
J16: Top Overlay "2" at 196.875,166.116 h0.76 r90; Top Overlay "1" at 194.197,166.141 h0.76 r90; Top Overlay "9" at 194.197,151.384 h0.76 r90; Top Overlay "10" at 196.875,150.965 h0.76 r90
J17: Top Overlay "23" at 122.555,4.572 h0.76; Top Overlay "24" at 122.25,7.392 h0.76; Top Overlay "1" at 81.703,4.47 h0.76; Top Overlay "2" at 81.585,7.036 h0.76
J24: Top Overlay "39" at 71.226,197.231 h0.76 r180; Top Overlay "40" at 71.226,194.691 h0.76 r180; Top Overlay "2" at 123.55,194.691 h0.76 r180; Top Overlay "1" at 123.211,197.231 h0.76 r180
J25: Top Overlay "39" at 50.8,174.075 h0.76 r90; Top Overlay "40" at 48.26,174.075 h0.76 r90; Top Overlay "2" at 48.26,121.751 h0.76 r90; Top Overlay "1" at 50.8,122.089 h0.76 r90
J26: Top Overlay "59" at 82.513,128.34 h0.76 r180; Top Overlay "60" at 82.513,134.182 h0.76 r180; Top Overlay "1" at 98.519,128.213 h0.76 r180; Top Overlay "2" at 98.501,134.188 h0.76 r180
J27: Top Overlay "59" at 106.513,128.34 h0.76 r180; Top Overlay "60" at 106.513,134.182 h0.76 r180; Top Overlay "2" at 122.604,134.182 h0.76 r180; Top Overlay "1" at 122.519,128.213 h0.76 r180
J28: Top Overlay "2" at 98.601,160.217 h0.76 r180; Top Overlay "60" at 82.51,160.344 h0.76 r180; Top Overlay "1" at 98.516,166.186 h0.76 r180; Top Overlay "59" at 82.51,166.059 h0.76 r180
J29: Top Overlay "2" at 122.601,160.217 h0.76 r180; Top Overlay "60" at 106.51,160.344 h0.76 r180; Top Overlay "1" at 122.352,165.989 h0.76 r180; Top Overlay "59" at 106.51,166.059 h0.76 r180
JP23: Top Overlay "1" at 160.782,134.366 h0.76 r90; Top Overlay "2" at 158.242,134.112 h0.76 r90; Top Overlay "5" at 160.782,143.256 h0.76 r90; Top Overlay "6" at 158.242,143.256 h0.76 r90
SW1: Top Overlay "ON" at 17.23,137.795 h0.76
SW9: Top Overlay "ON" at 192.236,195.326 h0.76